# Altium PCB HamonLite_pcb.PcbDoc (part 2 of 2)
Units mm, origin at the board's own origin, x right, y up, seen from the top; angles counter-clockwise.
Board outline 85 x 83.5 mm, 4 copper layers (Top Layer, Int1 (GND), Int2 (PWR), Bottom Layer), stack 1.01 mm thick; 333 components, 256 nets, 1688 pads, 134 vias.
Unrouted connection lines stored in the file: 1037.
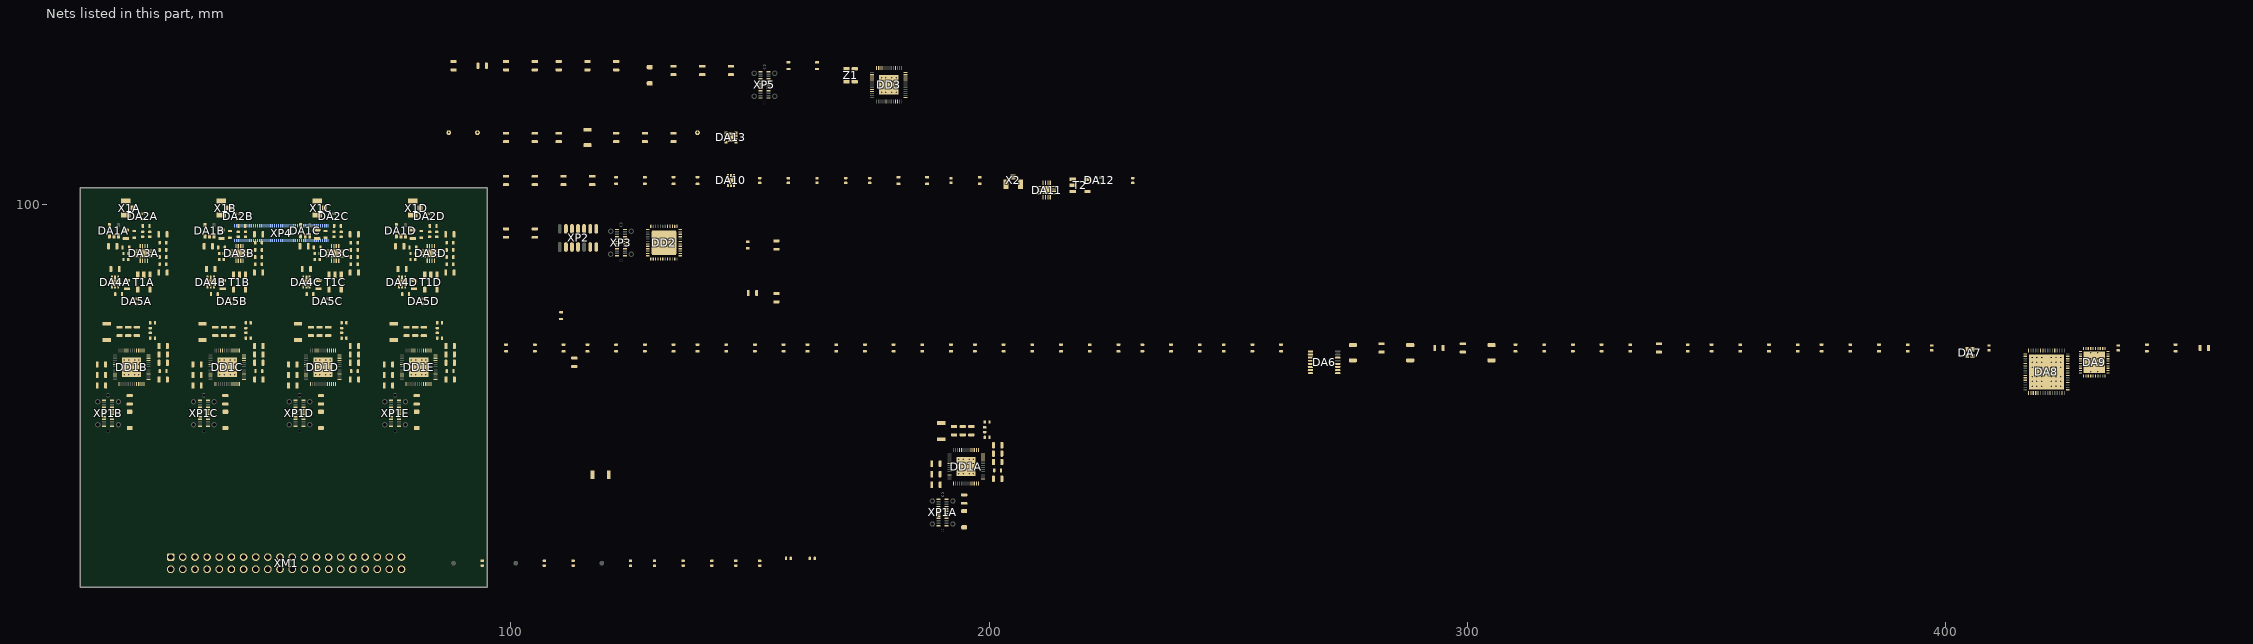
[diagram p2: the nets of this part, all layers, seen from the top]

## Part data
C1A C1B C1C C1D C1E C2A C2B C2C C2D C2E C3A C3B C3C C3D C3E C4A C4B C4C C4D C4E C5A C5B C5C C5D C5E C6A C6B C6C C6D C6E C7A C7B C7C C7D C7E C8A C8B C8C C8D C8E C9A C9B C9C C9D C9E C10A C10B C10C C10D C10E C11A C11B C11C C11D C12A C12B C12C C12D C13A C13B C13C C13D C14A C14B C14C C14D C15A C15B C15C C15D C16A C16B C16C C16D C17A C17B C17C C17D C18A C18B C18C C18D C19A C19B C19C C19D C20A C20B C20C C20D C21A C21B C21C C21D C22A C22B C22C C22D C23A C23B C23C C23D C24A C24B C24C C24D C25A C25B C25C C25D C26A C26B C26C C26D C27 C28 C29 C30 C31 C32 C33 C34 C35 C36 C37 C38 C39 C40 C41 C42 C43 C44 C45 C46 C47 C48 C49 C50 C51 C52 C53 C54 C55 C56 C57 C58 C59 C60 C61 C62 C63 C64 C65 C66 C67 C68 C69 C70 C71 C72 C73 C74 C75 C76 C77 C78 C79 C80 C81 C82 C83 C85 C86 C87 C88 C89 C90 C91 C92 C93 C94 C95 C96: library part Cap
  C27 C28 C29 C30 C31 C32 C33 C34 C35 C36 C37 C38 C39 C40 C41 C42 C43 C44 C45 C46 C47 C48 C49 C50 C51 C52 C54 C55 C56 C58 C60 C62: MAPPING=2(1,2,100)(1,2,100), Type=Capacitor
C84: library part Cap, Part number=GRM31CR60J107ME39L
DA1A DA1B DA1C DA1D: library part LP5907, Part number=LP5079MFX-3.0
DA2A DA2B DA2C DA2D DA5A DA5B DA5C DA5D DA12: "0.5-6.0GHz SPDT Switch", Part number=MXD8721
DA3A DA3B DA3C DA3D DA11: "Active Receive Mixer LF to 3 GHz", Manufacturer_Name="Analog Devices Inc", Copyright="Copyright (C) 2025 Ultra Librarian. All rights reserved.", Manufacturer_Part_Number=AD8342ACPZ-REEL7, RefDes=RefDes, Type=Type
DA4A DA4B DA4C DA4D DA10: "20 V, 200 mA, Low Noise, CMOS LDO Linear Regulator", Manufacturer_Name="Analog Devices Inc", Copyright="Copyright (C) 2026 Ultra Librarian. All rights reserved.", Datasheet=https://www.analog.com/media/en/technical-documentation/data-sheets/adp7118.pdf, Manufacturer_Part_Number=ADP7118ACPZN5.0-R7, RefDes=RefDes, Type=Type
DA6: "Low jitter, 1:8 LVCMOS fan-out clock buffer 16-TSSOP -40 to 85", Manufacturer="Texas Instruments", PartNumber=CDCLVC1108PWR, Alternate_PartNumber=CDCLVC1108PW, CompType=IC, Copyright="Copyright (C) 2026 Ultra Librarian. All rights reserved.", Datasheet=https://www.ti.com/lit/gpn/cdclvc1108, Manufacturer_Name="Texas Instruments", Manufacturer_Part_Number=CDCLVC1108PW, MountType=SMT, PackageReference=PW0016A, RefDes=RefDes, RoHS=Y, Type=TYPE
DA7: library part TCXO, Part number=NT2016SA-32MHz-END4263A
DA8: "Ultra low-noise clock jitter cleaner with dual loop PLLs 64-WQFN -40 to 85", Manufacturer_Name="Texas Instruments", Copyright="Copyright (C) 2026 Ultra Librarian. All rights reserved.", Datasheet=https://www.ti.com/lit/gpn/lmk04228, Manufacturer_Part_Number=LMK04228NKDR, RefDes=RefDes, Type=Type
DA9: "6.4-GHz low-power wideband RF synthesizer 40-VQFN -40 to 85", Manufacturer_Name="Texas Instruments", Copyright="Copyright (C) 2026 Ultra Librarian. All rights reserved.", Manufacturer_Part_Number=LMX2572RHAR, RefDes=RefDes, Type=TYPE
DA13: "17-V input 3-A step-down converter module with integrated inductor 8-uSiP -40 to 125", Manufacturer_Name="Texas Instruments", Copyright="Copyright (C) 2025 Ultra Librarian. All rights reserved.", Datasheet=https://www.ti.com/lit/gpn/tps82130, Manufacturer_Part_Number=TPS82130SILR, RefDes=RefDes, Type=TYPE
DD1A DD1B DD1C DD1D DD1E DD3: library part ESP32-S3, "Description", Manufacturer_Name="Espressif Systems", Copyright="Copyright (C) 2025 Ultra Librarian. All rights reserved.", Manufacturer_Part_Number=ESP32-S3, RefDes=RefDes, Type=Type
DD2: "Mainstream Arm Cortex-M4 MCU 170 MHz with 256 Kbytes of Flash memory, Math Accelerator, High Analog level integration"
FB1: library part FBEAD
R1A R1B R1C R1D R1E R2A R2B R2C R2D R2E R3A R3B R3C R3D R3E R4A R4B R4C R4D R4E R5A R5B R5C R5D R5E R6A R6B R6C R6D R7A R7B R7C R7D R8 R9 R10 R11 R12 R13 R14 R15 R16 R17 R18 R19 R20 R21 R22 R23 R24 R25 R26 R27 R28 R29 R30 R31 R32 R33 R34 R35 R36 R37 R38 R39 R40 R41 R42 R43 R44 R45 R46 R47 R48: library part res
  R4A R4B R4C R4D R4E R5A R5B R5C R5D R5E R21 R22 R23 R24 R28 R29 R30 R31 R32 R34 R35 R47 R48: MAPPING=2(1,2,100)(1,2,100), Type=Resistor
SB1A SB1B SB1C SB1D SB1E SB2: library part SW-PB
  SB1A SB1B SB1C SB1D SB1E: Part number="SW B3U-1000P"
T1A T1B T1C T1D T2: "Description", Manufacturer_Name="Mini Circuits", Copyright="Copyright (C) 2026 Ultra Librarian. All rights reserved.", Manufacturer_Part_Number=TC1-1T+, RefDes=RefDes, Type=Balun
TP1 TP2 TP3: library part TestPoint
VD1A VD1B VD1C VD1D VD1E VD2: library part "Shotktky Diode", Part number=BAT760
X1A X1B X1C X1D X2: library part Ipex
XP1A XP1B XP1C XP1D XP1E XP3 XP5: "Стандарт USB 3.1 , Тип стандарта Type C , Монтаж На плату, SMD , Тип разъема Розетка , Количество портов 1 , Расположение контактов Прямое", Part number=L-KLS1-5422
XP2: library part STDC-14
XP4: "DF40C 100 pin socket", Part number=DF40C-100DS-0.4V51
Z1: library part XTALE

## Via types
v1: diameter 0.6, hole 0.3, Top Layer to Bottom Layer, tented bottom, 96 vias
v2: diameter 0.6/0.6/0.6/0.6 (per signal layer), hole 0.3, Top Layer to Bottom Layer, 36 vias
v3: diameter 0.6, hole 0.3, Top Layer to Bottom Layer, 2 vias

## Nets (pads, with @x,y where several pads share a name; then routed paths per layer and width w, separated by ;. In a path a pad name is that pad's centre, name@x,y a point inside that pad or via, vN(x,y) a via of type N, cw(c..) or ccw(c..) an arc to the next point about the centre after c; other vN are vias at no path point)
ANTBIAS0: DA1A.5 XP4.53 XP4.54 XP4.55
ANTBIAS1: DA1B.5 XP4.65 XP4.66 XP4.67
ANTBIAS2: DA1C.5 XP4.69 XP4.70 XP4.71
ANTBIAS3: DA1D.5 XP4.81 XP4.82 XP4.83
AVCC5: T1A.2 T1B.2 T1C.2 T1D.2 T2.2
BOOT_9: DD3.5 SB2.2
BOOTA: DD1A.5 SB1A.2
BOOTB: DD1B.5 SB1B.2
BOOTC: DD1C.5 SB1C.2
BOOTD: DD1D.5 SB1D.2
BOOTE: DD1E.5 SB1E.2
BUF_CLK_5: DA8.40 R23.2
CAL_SW_1_N: DA5A.4 DA5B.4 DA5C.4 DA5D.4 DA12.4 DD2.9
CAL_SW_1_P: DA5A.6 DA5B.6 DA5C.6 DA5D.6 DA12.6 DD2.8
CHIP_PU_9: DD3.4 R46.2
CHIP_PUA: DD1A.4 R1A.2
CHIP_PUB: DD1B.4 R1B.2
CHIP_PUC: DD1C.4 R1C.2
CHIP_PUD: DD1D.4 R1D.2
CHIP_PUE: DD1E.4 R1E.2
CLK: DD3.41 XM1.38
CLK_IN0: C1B.2 R28.1
CLK_IN1: C1C.2 R29.1
CLK_IN2: C1D.2 R31.1
CLK_IN3: C1E.2 R32.1
CLK_IN4: C1A.2 R30.1
CLKIN_SEL0_5: DA8.58 R27.1
CLKIN_SEL1_5: DA8.59 R33.1
CS: DD3.39 XM1.36
CS0: DD1B.39 XM1.2
CS1: DD1C.39 XM1.8
CS2: DD1D.39 XM1.14
CS3: DD1E.39 XM1.20
CS4: DD1A.39 XM1.26
GND: C2A.1 C2B.1 C2C.1 C2D.1 C2E.1 C3A.1 C3B.1 C3C.1 C3D.1 C3E.1 C4A.2 C4B.2 C4C.2 C4D.2 C4E.2 C5A.2 C5B.2 C5C.2 C5D.2 C5E.2 C6A.2 C6B.2 C6C.2 C6D.2 C6E.2 C7A.2 C7B.2 C7C.2 C7D.2 C7E.2 C8A.2 C8B.2 C8C.2 C8D.2 C8E.2 C9A.2 C9B.2 C9C.2 C9D.2 C9E.2 C10A.2 C10B.2 C10C.2 C10D.2 C10E.2 C11A.2 C11B.2 C11C.2 C11D.2 C13A.1 C13B.1 C13C.1 C13D.1 C14A.1 C14B.1 C14C.1 C14D.1 C16A.2 C16B.2 C16C.2 C16D.2 C17A.2 C17B.2 C17C.2 C17D.2 C18A.2 C18B.2 C18C.2 C18D.2 C19A.2 C19B.2 C19C.2 C19D.2 C20A.2 C20B.2 C20C.2 C20D.2 C21A.2 C21B.2 C21C.2 C21D.2 C22A.2 C22B.2 C22C.2 C22D.2 C23A.2 C23B.2 C23C.2 C23D.2 C24A.2 C24B.2 C24C.2 C24D.2 C25A.2 C25B.2 C25C.2 C25D.2 C26A.2 C26B.2 C26C.2 C26D.2 C27.2 C28.2 C29.2 C30.2 C31.2 C32.2 C33.2 C34.2 C35.2 C36.2 C37.2 C38.2 C39.2 C40.2 C41.2 C43.2 C44.2 C45.2 C46.2 C47.2 C48.2 C49.2 C50.2 C51.2 C52.2 C53.1 C54.2 C55.2 C56.2 C57.2 C58.2 C59.1 C60.2 C61.1 C62.2 C63.2 C64.1 C65.2 C70.1 C71.1 C72.2 C74.2 C75.2 C76.2 C77.2 C78.2 C79.2 C80.2 C81.2 C82.2 C83.2 C84.2 C85.2 C86.2 C87.2 C88.2 C89.2 C90.2 C91.2 C92.2 C93.2 C94.2 C95.2 C96.2 DA1A.2 DA1B.2 DA1C.2 DA1D.2 DA2A.2 DA2B.2 DA2C.2 DA2D.2 DA3A.4 DA3A.5 DA3A.8 DA3A.9 DA3A.11 DA3A.13 DA3A.17 DA3B.4 DA3B.5 DA3B.8 DA3B.9 DA3B.11 DA3B.13 DA3B.17 DA3C.4 DA3C.5 DA3C.8 DA3C.9 DA3C.11 DA3C.13 DA3C.17 DA3D.4 DA3D.5 DA3D.8 DA3D.9 DA3D.11 DA3D.13 DA3D.17 DA4A.3 DA4A.7 DA4B.3 DA4B.7 DA4C.3 DA4C.7 DA4D.3 DA4D.7 DA5A.2 DA5B.2 DA5C.2 DA5D.2 DA6.4 DA6.7 DA6.12 DA7.1 DA7.2 DA8.65 DA9.2 DA9.4 DA9.5 DA9.6 DA9.13 DA9.14 DA9.25 DA9.28 DA9.30 DA9.31 DA9.32 DA9.34 DA9.39 DA9.40 DA9.41 DA10.3 DA10.7 DA11.4 DA11.5 DA11.8 DA11.9 DA11.11 DA11.13 DA11.17 DA12.2 DA13.3 DA13.9 DD1A.57 DD1B.57 DD1C.57 DD1D.57 DD1E.57 DD2.49 DD3.57 R2A.2 R2B.2 R2C.2 R2D.2 R2E.2 R4A.2 R4B.2 R4C.2 R4D.2 R4E.2 R5A.2 R5B.2 R5C.2 R5D.2 R5E.2 R7A.2 R7B.2 R7C.2 R7D.2 R21.2 R22.2 R25.2 R26.2 R27.2 R33.2 R36.1 R37.2 R39.2 R40.2 R42.2 R45.2 R47.2 R48.2 SB1A.1 SB1B.1 SB1C.1 SB1D.1 SB1E.1 SB2.1 T1A.4 T1B.4 T1C.4 T1D.4 T2.4 TP2.1 X1A.2 X1B.2 X1C.2 X1D.2 X2.2 XM1.29 XP1A.A1 XP1A.A12 XP1A.B1 XP1A.B12 XP1B.A1 XP1B.A12 XP1B.B1 XP1B.B12 XP1C.A1 XP1C.A12 XP1C.B1 XP1C.B12 XP1D.A1 XP1D.A12 XP1D.B1 XP1D.B12 XP1E.A1 XP1E.A12 XP1E.B1 XP1E.B12 XP2.5 XP2.7 XP2.11 XP3.A1 XP3.A12 XP3.B1 XP3.B12 XP4.1 XP4.2 XP4.3 XP4.5 XP4.6 XP4.7 XP4.8 XP4.9 XP4.10 XP4.11 XP4.12 XP4.13 XP4.14 XP4.15 XP4.17 XP4.18 XP4.19 XP4.21 XP4.22 XP4.23 XP4.24 XP4.25 XP4.26 XP4.27 XP4.28 XP4.29 XP4.30 XP4.31 XP4.33 XP4.34 XP4.35 XP4.36 XP4.37 XP4.38 XP4.39 XP4.40 XP4.41 XP4.42 XP4.43 XP4.44 XP4.45 XP4.46 XP4.47 XP4.48 XP4.49 XP4.50 XP4.51 XP4.52 XP4.56 XP4.57 XP4.58 XP4.59 XP4.60 XP4.61 XP4.62 XP4.63 XP4.64 XP4.68 XP4.72 XP4.73 XP4.74 XP4.75 XP4.76 XP4.77 XP4.78 XP4.79 XP4.80 XP4.84 XP4.85 XP4.86 XP4.87 XP4.88 XP4.89 XP4.90 XP4.91 XP4.92 XP4.93 XP4.94 XP4.95 XP4.96 XP4.97 XP4.98 XP4.99 XP4.100 XP5.A1 XP5.A12 XP5.B1 XP5.B12 Z1.2 Z1.4
  other v1: 193.626,43.676 194.515,43.676 195.785,43.676 196.674,43.676 193.626,44.565 194.515,44.565 195.785,44.565 196.674,44.565 193.626,45.835 194.515,45.835 195.785,45.835 196.674,45.835 193.626,46.724 194.515,46.724 195.785,46.724 196.674,46.724 19.176,64.426 20.065,64.426 21.335,64.426 22.224,64.426 39.176,64.426 40.065,64.426 41.335,64.426 42.224,64.426 59.176,64.426 60.065,64.426 61.335,64.426 62.224,64.426 79.176,64.426 80.065,64.426 81.335,64.426 82.224,64.426 19.176,65.315 20.065,65.315 21.335,65.315 22.224,65.315 39.176,65.315 40.065,65.315 41.335,65.315 42.224,65.315 59.176,65.315 60.065,65.315 61.335,65.315 62.224,65.315 79.176,65.315 80.065,65.315 81.335,65.315 82.224,65.315 19.176,66.585 20.065,66.585 21.335,66.585 22.224,66.585 39.176,66.585 40.065,66.585 41.335,66.585 42.224,66.585 59.176,66.585 60.065,66.585 61.335,66.585 62.224,66.585 79.176,66.585 80.065,66.585 81.335,66.585 82.224,66.585 19.176,67.474 20.065,67.474 21.335,67.474 22.224,67.474 39.176,67.474 40.065,67.474 41.335,67.474 42.224,67.474 59.176,67.474 60.065,67.474 61.335,67.474 62.224,67.474 79.176,67.474 80.065,67.474 81.335,67.474 82.224,67.474 177.476,123.476 178.365,123.476 179.635,123.476 180.524,123.476 177.476,124.365 178.365,124.365 179.635,124.365 180.524,124.365 177.476,125.635 178.365,125.635 179.635,125.635 180.524,125.635 177.476,126.524 178.365,126.524 179.635,126.524 180.524,126.524
  other v2: 418,62 419,62 420,62 422,62 423,62 424,62 418,63 419,63 420,63 422,63 423,63 424,63 418,64 419,64 420,64 422,64 423,64 424,64 418,66 419,66 420,66 422,66 423,66 424,66 418,67 419,67 420,67 422,67 423,67 424,67 418,68 419,68 420,68 422,68 423,68 424,68
  other v3: 146,113.5 146,114.5
I2C_SCL_1: DD1A.11 DD1B.11 DD1C.11 DD1D.11 DD1E.11 DD2.31 DD3.11 R20.1 XM1.33
I2C_SDA_1: DD1A.10 DD1B.10 DD1C.10 DD1D.10 DD1E.10 DD2.30 DD3.10 R19.1 XM1.34
IF_7_N: DA11.6 T2.3
IF_7_P: DA11.7 T2.1
IFA: C3A.2 DA12.5 R3A.1
IFA_N: DA3A.6 T1A.1
IFA_P: DA3A.7 T1A.3
IFB: C3B.2 DA5A.5 R3B.1
IFB_N: DA3B.6 T1B.1
IFB_P: DA3B.7 T1B.3
IFC: C3C.2 DA5B.5 R3C.1
IFC_N: DA3C.6 T1C.1
IFC_P: DA3C.7 T1C.3
IFD: C3D.2 DA5C.5 R3D.1
IFD_N: DA3D.6 T1D.1
IFD_P: DA3D.7 T1D.3
IFE: C3E.2 DA5D.5 R3E.1
IO0: DD3.40 XM1.37
IO0S0: DD1B.40 XM1.3
IO0S1: DD1C.40 XM1.9
IO0S2: DD1D.40 XM1.15
IO0S3: DD1E.40 XM1.21
IO0S4: DD1A.40 XM1.27
IO1: DD3.42 XM1.39
IO1S0: DD1B.42 XM1.5
IO1S1: DD1C.42 XM1.11
IO1S2: DD1D.42 XM1.17
IO1S3: DD1E.42 XM1.23
IO1S4: DD1A.42 XM1.31
IO2: DD3.43 XM1.40
IO2S0: DD1B.43 XM1.6
IO2S1: DD1C.43 XM1.12
IO2S2: DD1D.43 XM1.18
IO2S3: DD1E.43 XM1.24
IO2S4: DD1A.43 XM1.32
IO3: DD3.38 XM1.35
IO3S0: DD1B.38 XM1.1
IO3S1: DD1C.38 XM1.7
IO3S2: DD1D.38 XM1.13
IO3S3: DD1E.38 XM1.19
IO3S4: DD1A.38 XM1.25
JTCK_4: DD2.37 XP2.6
JTDI_4: DD2.38 XP2.10
JTDO_4: DD2.41 XP2.8
JTMS_4: DD2.36 XP2.4
LMK_CLK: DA8.19 DD2.13
LMK_CS: DA8.18 DD2.14 R34.2
LMK_LD: DA8.31 DD2.18
LMK_RESET: DA8.5 DD2.16 R25.1
LMK_SD: DA8.20 DD2.15
LMK_SYNC: DA8.6 DD2.17 R26.1
LO0: C15A.1 R8.2
LO1: C15B.1 R9.2
LO2: C15C.1 R10.2
LO3: C15D.1 R11.2
MIX5V_7: C75.1 C76.1 C78.1 C79.1 C80.1 C81.1 C82.1 C83.1 DA10.1 DA10.2 DA11.1 DA11.12 DA11.16
MIX5VA: C18A.1 C20A.1 C21A.1 C22A.1 C23A.1 C24A.1 C25A.1 C26A.1 DA3A.1 DA3A.12 DA3A.16 DA4A.1 DA4A.2
MIX5VB: C18B.1 C20B.1 C21B.1 C22B.1 C23B.1 C24B.1 C25B.1 C26B.1 DA3B.1 DA3B.12 DA3B.16 DA4B.1 DA4B.2
MIX5VC: C18C.1 C20C.1 C21C.1 C22C.1 C23C.1 C24C.1 C25C.1 C26C.1 DA3C.1 DA3C.12 DA3C.16 DA4C.1 DA4C.2
MIX5VD: C18D.1 C20D.1 C21D.1 C22D.1 C23D.1 C24D.1 C25D.1 C26D.1 DA3D.1 DA3D.12 DA3D.16 DA4D.1 DA4D.2
MIXEN_1: DA4A.4 DA4B.4 DA4C.4 DA4D.4 DA10.4 DD2.12
NetC1A_1: C1A.1 DD1A.54
NetC1B_1: C1B.1 DD1B.54
NetC1C_1: C1C.1 DD1C.54
NetC1D_1: C1D.1 DD1D.54
NetC1E_1: C1E.1 DD1E.54
NetC2A_2: C2A.2 DD1A.1 R3A.2
NetC2B_2: C2B.2 DD1B.1 R3B.2
NetC2C_2: C2C.2 DD1C.1 R3C.2
NetC2D_2: C2D.2 DD1D.1 R3D.2
NetC2E_2: C2E.2 DD1E.1 R3E.2
NetC12A_1: C12A.1 DA2A.5
NetC12A_2: C12A.2 DA3A.15 R6A.1
NetC12B_1: C12B.1 DA2B.5
NetC12B_2: C12B.2 DA3B.15 R6B.1
NetC12C_1: C12C.1 DA2C.5
NetC12C_2: C12C.2 DA3C.15 R6C.1
NetC12D_1: C12D.1 DA2D.5
NetC12D_2: C12D.2 DA3D.15 R6D.1
NetC13A_2: C13A.2 DA3A.14 R6A.2
NetC13B_2: C13B.2 DA3B.14 R6B.2
NetC13C_2: C13C.2 DA3C.14 R6C.2
NetC13D_2: C13D.2 DA3D.14 R6D.2
NetC14A_2: C14A.2 DA3A.2
NetC14B_2: C14B.2 DA3B.2
NetC14C_2: C14C.2 DA3C.2
NetC14D_2: C14D.2 DA3D.2
NetC15A_2: C15A.2 DA3A.3
NetC15B_2: C15B.2 DA3B.3
NetC15C_2: C15C.2 DA3C.3
NetC15D_2: C15D.2 DA3D.3
NetC17A_1: C17A.1 DA4A.5
NetC17B_1: C17B.1 DA4B.5
NetC17C_1: C17C.1 DA4C.5
NetC17D_1: C17D.1 DA4D.5
NetC19A_1: C19A.1 DA3A.10 R7A.1
NetC19B_1: C19B.1 DA3B.10 R7B.1
NetC19C_1: C19C.1 DA3C.10 R7C.1
NetC19D_1: C19D.1 DA3D.10 R7D.1
NetC35_1: C35.1 DA8.44
NetC37_1: C37.1 C40.1 DA7.4 FB1.2
NetC42_1: C42.1 DA7.3
NetC42_2: C42.2 DA8.43
NetC45_1: C45.1 DA8.11
NetC46_1: C46.1 DA8.12
NetC51_1: C51.1 DA8.46 R35.2
NetC53_2: C53.2 DA9.36
NetC55_1: C55.1 R35.1
NetC57_1: C57.1 DA9.38
NetC59_2: C59.2 DA9.29
NetC61_2: C61.2 DA9.3
NetC63_1: C63.1 DA9.27
NetC64_2: C64.2 DA9.33
NetC65_1: C65.1 DA9.35
NetC66_1: C66.1 DA9.23
NetC66_2: C66.2 R17.1
NetC67_1: C67.1 DA9.22
NetC67_2: C67.2 R36.2
NetC68_1: C68.1 DA9.12
NetC68_2: C68.2 R37.1
NetC69_1: C69.1 X2.1
NetC69_2: C69.2 DA11.15 R38.1
NetC70_2: C70.2 DA11.14 R38.2
NetC71_2: C71.2 DA11.2
NetC73_1: C73.1 R12.2
NetC73_2: C73.2 DA11.3
NetC74_1: C74.1 DA10.5
NetC77_1: C77.1 DA11.10 R39.1
NetC86_1: C86.1 DA13.8
NetC88_1: C88.1 DD3.53 Z1.1
NetC89_1: C89.1 DD3.54 Z1.3
NetDA2A_3: DA2A.3 X1A.1
NetDA2B_3: DA2B.3 X1B.1
NetDA2C_3: DA2C.3 X1C.1
NetDA2D_3: DA2D.3 X1D.1
NetDA5A_1: DA5A.1 T1A.6
NetDA5B_1: DA5B.1 T1B.6
NetDA5C_1: DA5C.1 T1C.6
NetDA5D_1: DA5D.1 T1D.6
NetDA6_1: DA6.1 R23.1
NetDA6_2: DA6.2 R24.2
NetDA6_3: DA6.3 R28.2
NetDA6_6: DA6.6 R29.2
NetDA6_8: DA6.8 R31.2
NetDA6_9: DA6.9 R32.2
NetDA6_11: DA6.11 R30.2
NetDA12_1: DA12.1 T2.6
NetDA12_3: DA12.3 R40.1 R41.2
NetDA13_6: DA13.6 R44.1 R45.1
NetDA13_7: DA13.7 R43.2
NetDD1A_53: DD1A.53 R2A.1
NetDD1B_53: DD1B.53 R2B.1
NetDD1C_53: DD1C.53 R2C.1
NetDD1D_53: DD1D.53 R2D.1
NetDD1E_53: DD1E.53 R2E.1
NetR4A_1: R4A.1 XP1A.A5
NetR4B_1: R4B.1 XP1B.A5
NetR4C_1: R4C.1 XP1C.A5
NetR4D_1: R4D.1 XP1D.A5
NetR4E_1: R4E.1 XP1E.A5
NetR5A_1: R5A.1 XP1A.B5
NetR5B_1: R5B.1 XP1B.B5
NetR5C_1: R5C.1 XP1C.B5
NetR5D_1: R5D.1 XP1D.B5
NetR5E_1: R5E.1 XP1E.B5
NetR8_1: R8.1 R9.1 R10.1 R11.1 R12.1 R17.2
NetR13_1: R13.1 R14.1 R15.1 R16.1 R18.2
NetR21_1: R21.1 XP3.A5
NetR22_1: R22.1 XP3.B5
NetR47_1: R47.1 XP5.A5
NetR48_1: R48.1 XP5.B5
PHASE_CAL_1: R18.1 R41.1 R42.1
PHASE_SYNC0: DA5A.3 R13.2
PHASE_SYNC1: DA5B.3 R14.2
PHASE_SYNC2: DA5C.3 R15.2
PHASE_SYNC3: DA5D.3 R16.2
PL_SW_1_N: DA2A.4 DA2B.4 DA2C.4 DA2D.4 DD2.11
PL_SW_1_P: DA2A.6 DA2B.6 DA2C.6 DA2D.6 DD2.10
RF_IN0: DA2A.1 XP4.4
RF_IN1: DA2B.1 XP4.16
RF_IN2: DA2C.1 XP4.20
RF_IN3: DA2D.1 XP4.32
RST_4: DD2.7 XP2.12
SPI_CLK0: DD1B.41 XM1.4
SPI_CLK1: DD1C.41 XM1.10
SPI_CLK2: DD1D.41 XM1.16
SPI_CLK3: DD1E.41 XM1.22
SPI_CLK4: DD1A.41 XM1.28
SYNTH_CE: DA9.1 DD2.29
SYNTH_CLK: DA9.16 DD2.26
SYNTH_CLK_5_N: DA8.2 DA9.9
SYNTH_CLK_5_P: DA8.1 DA9.8
SYNTH_CS: DA9.24 DD2.25
SYNTH_MOSI: DA9.17 DD2.28
SYNTH_MUXOUT: DA9.20 DD2.27
UART_RX_4: DD2.40 XP2.13
UART_TX_4: DD2.39 XP2.14
USB_D_4_N: DD2.33 XP3.A7 XP3.B7
USB_D_4_P: DD2.34 XP3.A6 XP3.B6
USB_D_9_N: DD3.25 XP5.A7 XP5.B7
USB_D_9_P: DD3.26 XP5.A6 XP5.B6
USB_DA_N: DD1A.25 XP1A.A7 XP1A.B7
USB_DA_P: DD1A.26 XP1A.A6 XP1A.B6
USB_DB_N: DD1B.25 XP1B.A7 XP1B.B7
USB_DB_P: DD1B.26 XP1B.A6 XP1B.B6
USB_DC_N: DD1C.25 XP1C.A7 XP1C.B7
USB_DC_P: DD1C.26 XP1C.A6 XP1C.B6
USB_DD_N: DD1D.25 XP1D.A7 XP1D.B7
USB_DD_P: DD1D.26 XP1D.A6 XP1D.B6
USB_DE_N: DD1E.25 XP1E.A7 XP1E.B7
USB_DE_P: DD1E.26 XP1E.A6 XP1E.B6
VBUS_OTG_4: XP3.A4 XP3.A9 XP3.B4 XP3.B9
VBUS_OTG_9: VD2.A XP5.A4 XP5.A9 XP5.B4 XP5.B9
VBUS_OTGA: VD1A.A XP1A.A4 XP1A.A9 XP1A.B4 XP1A.B9
VBUS_OTGB: VD1B.A XP1B.A4 XP1B.A9 XP1B.B4 XP1B.B9
VBUS_OTGC: VD1C.A XP1C.A4 XP1C.A9 XP1C.B4 XP1C.B9
VBUS_OTGD: VD1D.A XP1D.A4 XP1D.A9 XP1D.B4 XP1D.B9
VBUS_OTGE: VD1E.A XP1E.A4 XP1E.A9 XP1E.B4 XP1E.B9
VCC: C4A.1 C4B.1 C4C.1 C4D.1 C4E.1 C5A.1 C5B.1 C5C.1 C5D.1 C5E.1 C6A.1 C6B.1 C6C.1 C6D.1 C6E.1 C7A.1 C7B.1 C7C.1 C7D.1 C7E.1 C8A.1 C8B.1 C8C.1 C8D.1 C8E.1 C9A.1 C9B.1 C9C.1 C9D.1 C9E.1 C10A.1 C10B.1 C10C.1 C10D.1 C10E.1 C11A.1 C11B.1 C11C.1 C11D.1 C27.1 C28.1 C29.1 C30.1 C31.1 C32.1 C33.1 C34.1 C36.1 C38.1 C39.1 C41.1 C43.1 C44.1 C47.1 C48.1 C49.1 C50.1 C52.1 C54.1 C56.1 C58.1 C60.1 C62.1 C87.1 C90.1 C91.1 C92.1 C93.1 C94.1 C95.1 C96.1 DA1A.1 DA1A.3 DA1B.1 DA1B.3 DA1C.1 DA1C.3 DA1D.1 DA1D.3 DA6.5 DA6.10 DA6.14 DA8.10 DA8.17 DA8.21 DA8.26 DA8.33 DA8.36 DA8.39 DA8.42 DA8.45 DA8.47 DA8.53 DA8.64 DA9.7 DA9.10 DA9.11 DA9.15 DA9.21 DA9.26 DA9.37 DA13.4 DA13.5 DD1A.2 DD1A.3 DD1A.20 DD1A.29 DD1A.46 DD1A.55 DD1A.56 DD1B.2 DD1B.3 DD1B.20 DD1B.29 DD1B.46 DD1B.55 DD1B.56 DD1C.2 DD1C.3 DD1C.20 DD1C.29 DD1C.46 DD1C.55 DD1C.56 DD1D.2 DD1D.3 DD1D.20 DD1D.29 DD1D.46 DD1D.55 DD1D.56 DD1E.2 DD1E.3 DD1E.20 DD1E.29 DD1E.46 DD1E.55 DD1E.56 DD2.1 DD2.20 DD2.21 DD2.23 DD2.35 DD2.48 DD3.2 DD3.3 DD3.20 DD3.29 DD3.46 DD3.55 DD3.56 FB1.1 R1A.1 R1B.1 R1C.1 R1D.1 R1E.1 R19.2 R20.2 R24.1 R34.1 R43.1 R44.2 R46.1 TP3.1 XP2.3
VIN5: C84.1 C85.1 DA13.1 DA13.2 VD1A.C VD1B.C VD1C.C VD1D.C VD1E.C VD2.C XM1.30
VINHP: C16A.1 C16B.1 C16C.1 C16D.1 C72.1 DA4A.6 DA4B.6 DA4C.6 DA4D.6 DA10.6 TP1.1
pads on no net: DA1A.4 DA1B.4 DA1C.4 DA1D.4 DA6.13 DA6.15 DA6.16 DA8.3 DA8.4 DA8.7 DA8.8 DA8.9 DA8.13 DA8.14 DA8.15 DA8.16 DA8.22 DA8.23 DA8.24 DA8.25 DA8.27 DA8.28 DA8.29 DA8.30 DA8.32 DA8.34 DA8.35 DA8.37 DA8.38 DA8.41 DA8.48 DA8.49 DA8.50 DA8.51 DA8.52 DA8.54 DA8.55 DA8.56 DA8.57 DA8.60 DA8.61 DA8.62 DA8.63 DA9.18 DA9.19 DA9.V DD1A.6 DD1A.7 DD1A.8 DD1A.9 DD1A.12 DD1A.13 DD1A.14 DD1A.15 DD1A.16 DD1A.17 DD1A.18 DD1A.19 DD1A.21 DD1A.22 DD1A.23 DD1A.24 DD1A.27 DD1A.28 DD1A.30 DD1A.31 DD1A.32 DD1A.33 DD1A.34 DD1A.35 DD1A.36 DD1A.37 DD1A.44 DD1A.45 DD1A.47 DD1A.48 DD1A.49 DD1A.50 DD1A.51 DD1A.52 DD1B.6 DD1B.7 DD1B.8 DD1B.9 DD1B.12 DD1B.13 DD1B.14 DD1B.15 DD1B.16 DD1B.17 DD1B.18 DD1B.19 DD1B.21 DD1B.22 DD1B.23 DD1B.24 DD1B.27 DD1B.28 DD1B.30 DD1B.31 DD1B.32 DD1B.33 DD1B.34 DD1B.35 DD1B.36 DD1B.37 DD1B.44 DD1B.45 DD1B.47 DD1B.48 DD1B.49 DD1B.50 DD1B.51 DD1B.52 DD1C.6 DD1C.7 DD1C.8 DD1C.9 DD1C.12 DD1C.13 DD1C.14 DD1C.15 DD1C.16 DD1C.17 DD1C.18 DD1C.19 DD1C.21 DD1C.22 DD1C.23 DD1C.24 DD1C.27 DD1C.28 DD1C.30 DD1C.31 DD1C.32 DD1C.33 DD1C.34 DD1C.35 DD1C.36 DD1C.37 DD1C.44 DD1C.45 DD1C.47 DD1C.48 DD1C.49 DD1C.50 DD1C.51 DD1C.52 DD1D.6 DD1D.7 DD1D.8 DD1D.9 DD1D.12 DD1D.13 DD1D.14 DD1D.15 DD1D.16 DD1D.17 DD1D.18 DD1D.19 DD1D.21 DD1D.22 DD1D.23 DD1D.24 DD1D.27 DD1D.28 DD1D.30 DD1D.31 DD1D.32 DD1D.33 DD1D.34 DD1D.35 DD1D.36 DD1D.37 DD1D.44 DD1D.45 DD1D.47 DD1D.48 DD1D.49 DD1D.50 DD1D.51 DD1D.52 DD1E.6 DD1E.7 DD1E.8 DD1E.9 DD1E.12 DD1E.13 DD1E.14 DD1E.15 DD1E.16 DD1E.17 DD1E.18 DD1E.19 DD1E.21 DD1E.22 DD1E.23 DD1E.24 DD1E.27 DD1E.28 DD1E.30 DD1E.31 DD1E.32 DD1E.33 DD1E.34 DD1E.35 DD1E.36 DD1E.37 DD1E.44 DD1E.45 DD1E.47 DD1E.48 DD1E.49 DD1E.50 DD1E.51 DD1E.52 DD2.2 DD2.3 DD2.4 DD2.5 DD2.6 DD2.19 DD2.22 DD2.24 DD2.32 DD2.42 DD2.43 DD2.44 DD2.45 DD2.46 DD2.47 DD3.1 DD3.6 DD3.7 DD3.8 DD3.9 DD3.12 DD3.13 DD3.14 DD3.15 DD3.16 DD3.17 DD3.18 DD3.19 DD3.21 DD3.22 DD3.23 DD3.24 DD3.27 DD3.28 DD3.30 DD3.31 DD3.32 DD3.33 DD3.34 DD3.35 DD3.36 DD3.37 DD3.44 DD3.45 DD3.47 DD3.48 DD3.49 DD3.50 DD3.51 DD3.52 FID1.1 FID2.1 FID3.1 XP1A. XP1A.A2 XP1A.A3 XP1A.A8 XP1A.A10 XP1A.A11 XP1A.B2 XP1A.B3 XP1A.B8 XP1A.B10 XP1A.B11 XP1B. XP1B.A2 XP1B.A3 XP1B.A8 XP1B.A10 XP1B.A11 XP1B.B2 XP1B.B3 XP1B.B8 XP1B.B10 XP1B.B11 XP1C. XP1C.A2 XP1C.A3 XP1C.A8 XP1C.A10 XP1C.A11 XP1C.B2 XP1C.B3 XP1C.B8 XP1C.B10 XP1C.B11 XP1D. XP1D.A2 XP1D.A3 XP1D.A8 XP1D.A10 XP1D.A11 XP1D.B2 XP1D.B3 XP1D.B8 XP1D.B10 XP1D.B11 XP1E. XP1E.A2 XP1E.A3 XP1E.A8 XP1E.A10 XP1E.A11 XP1E.B2 XP1E.B3 XP1E.B8 XP1E.B10 XP1E.B11 XP2.1 XP2.2 XP2.9 XP3. XP3.A2 XP3.A3 XP3.A8 XP3.A10 XP3.A11 XP3.B2 XP3.B3 XP3.B8 XP3.B10 XP3.B11 XP5. XP5.A2 XP5.A3 XP5.A8 XP5.A10 XP5.A11 XP5.B2 XP5.B3 XP5.B8 XP5.B10 XP5.B11

## Text inside footprints (layer, text, board x,y; h text height)
DA8: Mechanical 13 "*" at 416.644,68.366 h1.27